# Altium PCB adau1979-fpga.PcbDoc (part 10 of 10)
Units mil, origin at the board's own origin, x right, y up, seen from the top; angles counter-clockwise.
Board outline 7874.02 x 9055.12 mil, 4 copper layers (Top Layer, GND, POWER, Bottom Layer), stack 23.756 mil thick; 636 components, 457 nets, 2015 pads, 4184 vias.
Unrouted connection lines stored in the file: 10.
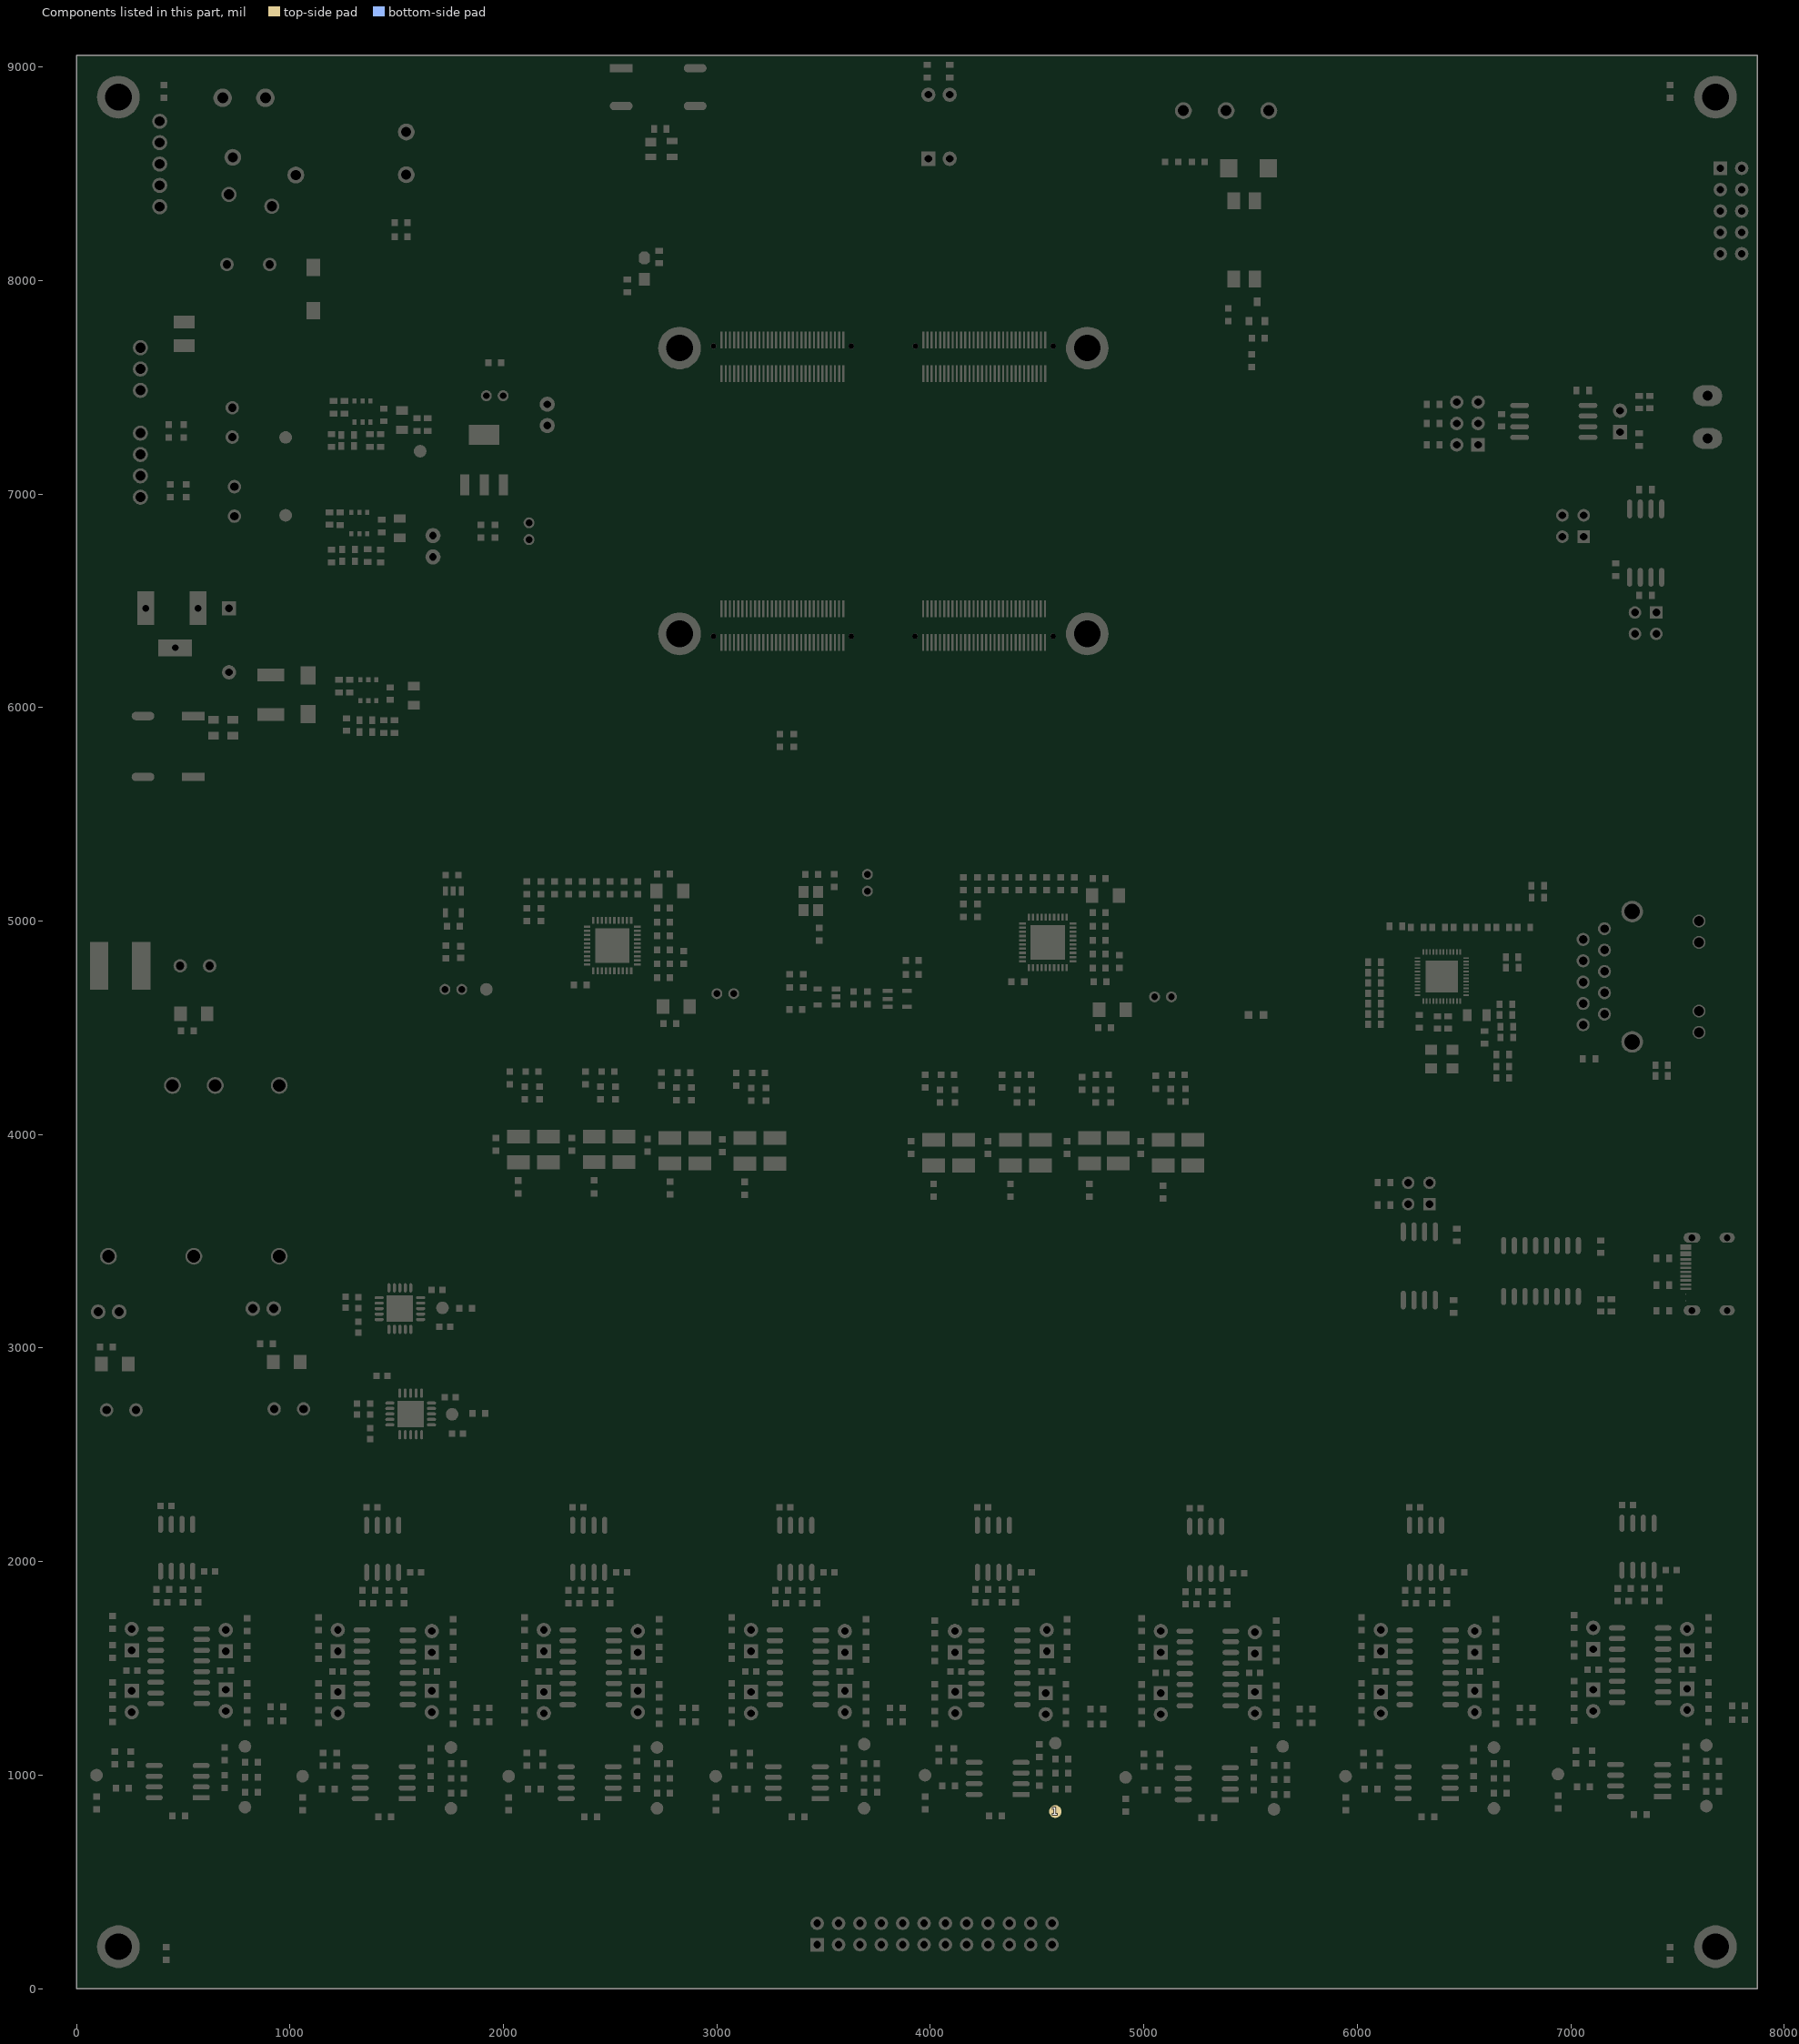
[diagram p9: the components of this part, seen from the top]

## Other copper (continued)
Bottom Layer:
  pour cut-out: 7263.67,2015.94 7263.76,2015.84 7320.34,2015.84 7320.34,1899.3 7327.23,1892.42 7327.23,1772.76 7271.84,1772.76 7263.67,1780.94
  pour cut-out: 6267.48,2005.93 6267.57,2005.84 6324.15,2005.84 6324.15,1889.3 6331.04,1882.41 6331.04,1762.76 6275.65,1762.76 6267.48,1770.93
  pour cut-out: 5237.48,2000.93 5237.57,2000.84 5294.15,2000.84 5294.15,1884.3 5301.04,1877.41 5301.04,1757.76 5245.65,1757.76 5237.48,1765.93
  pour cut-out: 4243.07,2005.93 4243.17,2005.84 4299.75,2005.84 4299.75,1889.3 4306.63,1882.41 4306.63,1762.76 4251.25,1762.76 4243.07,1770.93
  pour cut-out: 3317.48,2005.93 3317.57,2005.84 3374.15,2005.84 3374.15,1889.3 3381.04,1882.41 3381.04,1762.76 3325.65,1762.76 3317.48,1770.93
  pour cut-out: 2338.07,1995.93 2338.17,1995.84 2394.75,1995.84 2394.75,1879.3 2401.63,1872.41 2401.63,1752.76 2346.25,1752.76 2338.07,1760.93
  pour cut-out: 1373.07,2010.93 1373.17,2010.84 1429.75,2010.84 1429.75,1894.3 1436.63,1887.41 1436.63,1767.76 1381.25,1767.76 1373.07,1775.93
  pour cut-out: 408.07,2005.93 408.17,2005.84 464.75,2005.84 464.75,1889.3 471.63,1882.41 471.63,1762.76 416.25,1762.76 408.07,1770.93
  pour cut-out: 7379.41,975 7379.41,925 7384.41,920 7479.41,920 7499.41,900 7659.41,900 7674.41,915 7674.41,975
  pour cut-out: 6384.41,965 6384.41,915 6389.41,910 6484.41,910 6504.41,890 6664.41,890 6679.41,905 6679.41,965
  pour cut-out: 5354.41,960 5354.41,910 5359.41,905 5454.41,905 5474.41,885 5634.41,885 5649.41,900 5649.41,960
  pour cut-out: 4375,985 4375,935 4380,930 4475,930 4495,910 4655,910 4655,985
  pour cut-out: 3434.41,965 3434.41,915 3439.41,910 3534.41,910 3554.41,890 3714.41,890 3729.41,905 3729.41,965
  pour cut-out: 2464.41,965 2464.41,915 2469.41,910 2564.41,910 2584.41,890 2744.41,890 2759.41,905 2759.41,965
  pour cut-out: 1499.41,965 1499.41,915 1504.41,910 1599.41,910 1619.41,890 1779.41,890 1794.41,905 1794.41,965
  pour cut-out: 534.41,970 534.41,920 539.41,915 634.41,915 654.41,895 814.41,895 829.41,910 829.41,970
GND (plane layer: these items are gaps in the copper):
  pour cut-out: 7262.48,2015.93 7262.57,2015.84 7319.15,2015.84 7319.15,1899.3 7326.04,1892.41 7326.04,1772.76 7270.65,1772.76 7262.48,1780.93
  pour cut-out: 6267.48,2005.93 6267.57,2005.84 6324.15,2005.84 6324.15,1889.3 6331.04,1882.41 6331.04,1762.76 6275.65,1762.76 6267.48,1770.93
  pour cut-out: 5237.48,2000.93 5237.57,2000.84 5294.15,2000.84 5294.15,1884.3 5301.04,1877.41 5301.04,1757.76 5245.65,1757.76 5237.48,1765.93
  pour cut-out: 4243.92,2003.37 4244.01,2003.27 4300.59,2003.27 4300.59,1886.73 4307.48,1879.85 4307.48,1760.19 4252.09,1760.19 4243.92,1768.37
  pour cut-out: 3318.92,2008.37 3319.01,2008.27 3375.59,2008.27 3375.59,1891.73 3382.48,1884.85 3382.48,1765.19 3327.09,1765.19 3318.92,1773.37
  pour cut-out: 2338.07,1995.93 2338.17,1995.84 2394.75,1995.84 2394.75,1879.3 2401.63,1872.41 2401.63,1752.76 2346.25,1752.76 2338.07,1760.93
  pour cut-out: 1373.33,2003.37 1373.42,2003.27 1430,2003.27 1430,1886.73 1436.89,1879.84 1436.89,1760.19 1381.5,1760.19 1373.33,1768.37
  pour cut-out: 408.07,2005.93 408.17,2005.84 464.75,2005.84 464.75,1889.3 471.63,1882.41 471.63,1762.76 416.25,1762.76 408.07,1770.93
  pour cut-out: 4375,985 4375,935 4380,930 4475,930 4495,910 4615,910 4615,985
  pour cut-out: 7379.41,975 7379.41,925 7384.41,920 7479.41,920 7499.41,900 7659.41,900 7674.41,915 7674.41,975
  pour cut-out: 6384.41,965 6384.41,915 6389.41,910 6484.41,910 6504.41,890 6664.41,890 6679.41,905 6679.41,965
  pour cut-out: 5354.41,960 5354.41,910 5359.41,905 5454.41,905 5474.41,885 5634.41,885 5649.41,900 5649.41,960
  pour cut-out: 3434.41,965 3434.41,915 3439.41,910 3534.41,910 3554.41,890 3714.41,890 3729.41,905 3729.41,965
  pour cut-out: 2464.41,965 2464.41,915 2469.41,910 2564.41,910 2584.41,890 2744.41,890 2759.41,905 2759.41,965
  pour cut-out: 1499.41,965 1499.41,915 1504.41,910 1599.41,910 1619.41,890 1779.41,890 1794.41,905 1794.41,965
  pour cut-out: 534.41,970 534.41,920 539.41,915 634.41,915 654.41,895 814.41,895 829.41,910 829.41,970
  lines w10: 0,4975 0,9055.12 7874.02,9055.12 7874.02,2900 5530,2900 5530,4975 5450,4975 0,4975
POWER (plane layer: these items are gaps in the copper):
  pour cut-out: 1373.07,2010.93 1373.17,2010.84 1429.75,2010.84 1429.75,1894.3 1436.63,1887.41 1436.63,1767.76 1381.25,1767.76 1373.07,1775.93
  pour cut-out: 7263.67,2015.94 7263.76,2015.84 7320.34,2015.84 7320.34,1899.3 7327.23,1892.42 7327.23,1772.76 7271.84,1772.76 7263.67,1780.94
  pour cut-out: 6268.66,2005.94 6268.76,2005.84 6325.34,2005.84 6325.34,1889.3 6332.23,1882.42 6332.23,1762.76 6276.84,1762.76 6268.66,1770.94
  pour cut-out: 5238.66,2000.94 5238.76,2000.84 5295.34,2000.84 5295.34,1884.3 5302.23,1877.42 5302.23,1757.76 5246.84,1757.76 5238.66,1765.94
  pour cut-out: 4243.66,2010.94 4243.76,2010.84 4300.34,2010.84 4300.34,1894.3 4307.23,1887.42 4307.23,1767.76 4251.84,1767.76 4243.66,1775.94
  pour cut-out: 3318.66,2005.94 3318.76,2005.84 3375.34,2005.84 3375.34,1889.3 3382.23,1882.42 3382.23,1762.76 3326.84,1762.76 3318.66,1770.94
  pour cut-out: 2338.07,1995.93 2338.17,1995.84 2394.75,1995.84 2394.75,1879.3 2401.63,1872.41 2401.63,1752.76 2346.25,1752.76 2338.07,1760.93
  pour cut-out: 408.07,2005.93 408.17,2005.84 464.75,2005.84 464.75,1889.3 471.63,1882.41 471.63,1762.76 416.25,1762.76 408.07,1770.93
  pour cut-out: 7381.87,972.54 7381.87,922.54 7386.87,917.54 7481.87,917.54 7501.87,897.54 7661.87,897.54 7676.87,912.54 7676.87,972.54
  pour cut-out: 6386.87,962.54 6386.87,912.54 6391.87,907.54 6486.87,907.54 6506.87,887.54 6666.87,887.54 6681.87,902.54 6681.87,962.54
  pour cut-out: 5356.87,957.54 5356.87,907.54 5361.87,902.54 5456.87,902.54 5476.87,882.54 5636.87,882.54 5651.87,897.54 5651.87,957.54
  pour cut-out: 3434.41,965 3434.41,915 3439.41,910 3534.41,910 3554.41,890 3714.41,890 3729.41,905 3729.41,965
  pour cut-out: 2465.64,963.77 2465.64,913.77 2470.64,908.77 2565.64,908.77 2585.64,888.77 2745.64,888.77 2760.64,903.77 2760.64,963.77
  pour cut-out: 1499.41,965 1499.41,915 1504.41,910 1599.41,910 1619.41,890 1779.41,890 1794.41,905 1794.41,965
  pour cut-out: 534.41,970 534.41,920 539.41,915 634.41,915 654.41,895 814.41,895 829.41,910 829.41,970
  pour cut-out: 4375,985 4375,935 4380,930 4475,930 4495,910 4615,910 4615,985
  lines w20: -5,5440 1175,5440 1215,5480 ; -5,7520 390,7520 410,7540 1250,7540 1345,7445 1345,6570 ; 0,2970 265,2970 695,3400 1730,3400 1815,3315 1815,3115 1800,3100 1580,3100 1585,3105 1585,3259.17 1584.17,3260 1430,3260 1395,3295 765,3295 310,2840 310,2650 75,2415 75,1155 295,935 7270,935 7300,905 7300,720 7240,660 4690,660 4455,425 4385,425 4315,355 4315,185 4315,-5 ; 210,1190 455,1190 595,1330 595,1847.76 647.24,1900 705,1900 760,1845 760,1235 765,1230 895,1230 930,1265 930,1885 950,1905 980,1905 1020,1865 1020,1255 1050,1225 1535.57,1225 1585,1274.43 1585,1875 1605,1895 1655,1895 1675,1875 1675,1265 1725,1215 1830,1215 1870.1,1255.1 1870.1,1865.1 1905,1900 1940,1900 1970,1870 1970,1250 2010,1210 2500,1210 2555,1265 2555,1865 2580,1890 2620,1890 2655,1855 2655,1267.86 2717.86,1205 2795,1205 2860,1270 2860,1855 2885,1880 2930,1880 2955,1855 2955,1240 2995,1200 3460,1200 3510,1250 3510,1855 3545,1890 3610,1890 3640,1860 3640,1250 3670,1220 3780,1220 3815,1255 3815,1825 3855,1865 3890,1865 3915,1840 3915,1255 3950,1220 4375,1220 4430,1275 4430,1890 4445,1905 4490,1905 4510,1885 4510,1260 4550,1220 4615,1220 4670,1275 4670,1850 4720,1900 4785,1900 4835,1850 4835,1255 4875,1215 5355,1215 5405,1265 5405,1860 5440,1895 5490,1895 5515,1870 5515,1255 5555,1215 5619.25,1215 5675,1270.75 5675,1840 5715,1880 5800,1880 5840,1840 5840,1270 5910,1200 6355,1200 6450,1295 ; 465,2990 1765,2990 1890,2865 1890,2580 1840,2530 1447.5,2530 ; 1345,6565 2180,6565 4675,6565 ; 1350,6990 6470,6990 6835,7355 7230,7355 7430,7155 7430,6910 7170,6650 6707.52,6187.52 4787.52,6187.52 4680,6080 1440,6080 1350,5990 1350,5755 2075,5030 3140,5030 3285,4885 ; 1355,5895 5410,5895 5885,5420 6210,5095 6210,5035 6145,4970 6000,4970 5950,4920 5950,4815 5985,4780 6105.5,4780 6145.5,4820 6565,4820 6615,4870 6765,4870 6845,4950 6845,5220 5882.5,6182.5 ; 1690,4965 1810,4845 2525,4845 2595,4915 2935,4915 3120,4730 4330,4730 4565,4965 4910,4965 4945,4930 4945,4635 4910.5,4600.5 4830.6,4600.5 4796.1,4635 2205,4635 2050,4480 1615,4480 1590,4505 1590,4880 1685,4975 1685,5010 1215,5480 ; 2040,4480 2040,4425 1835,4220 1835,3865 1900,3800 4810,3800 5530,3080 7380,3080 7765,2695 7765,1245 7715,1195 7660,1195 7590,1265 7590,1875 7560,1905 7483.48,1905 7450,1871.52 7450,1275 7385,1210 6935,1210 6885,1260 6885,1855 6850,1890 6775,1890 6745,1860 6745,1280 6685,1220 6585,1220 6545,1260 6545,1870 6520,1895 6480,1895 6447.51,1862.51 6447.51,1295 ; 3290,4885 4005,4885 4090,4800 4090,4740 ; 3960,4625 3960,4125 4035,4050 4870,4050 5735,3185 7695,3185 7885,2995 7885,2975 ; 4685,6555 4685,6330 4560,6205 1365,6205 1215,6055 1215,5845 1215,5480 ; 4950,4925 5085,4790 ; 7755,2025 7370,2025 7345,2000 7345,1305 7325,1285 7125,1285 7085,1325 7085,1975 7030,2030 6410,2030 6350,1970 6350,1307.1 6322.9,1280 6041.96,1280 6010,1311.96 6010,1975 5960,2025 5380,2025 5315,1960 5315,1297.1 5302.9,1285 5060,1285 4989.41,1355.59 4989.41,1920.59 4915,1995 4385,1995 4340,1950 4340,1310.1 4309.9,1280 4045,1280 4022.48,1302.52 4022.48,1922.52 3940,2005 3435,2005 3400,1970 3400,1310.1 3364.9,1275 3075,1275 3040,1310 3040,1900 2935,2005 2455,2005 2430,1980 2430,1305 2415,1290 2095,1290 2040,1345 2040,1955 1995,2000 1520,2000 1480,1960 1480,1370 1430,1320 1155,1320 1120,1355 1120,1870 985,2005 580,2005 505,1930 505,1360 420,1275 340,1275 244.41,1370.59 244.41,2284.41 455,2495 1080,2495 1115,2530 1445,2530 1450,2525 1450,2820 1130,2820 900,2590 410,2590 130,2310 130,1260 300,1090 7870,1090

## Silkscreen, mask and mechanical layers (free items; w line width, h text height)
Top Overlay:
  circle w0.5: c4575.15,6335.16 r11.81
  circle w0.5: c4575.15,7693.42 r11.81
  circle w0.5: c4734.76,7683.58 r122.05
  circle w0.5: c4734.76,6345 r122.05
  circle w0.5: c3929.48,7693.42 r11.81
  circle w0.5: c3630.27,7693.42 r11.81
  circle w0.5: c3630.27,6335.16 r11.81
  circle w0.5: c3929.48,6335.16 r11.81
  circle w0.5: c2984.61,6335.16 r11.81
  circle w0.5: c2984.61,7693.42 r11.81
  circle w0.5: c2825,6345 r122.05
  circle w0.5: c2825,7683.58 r122.05
  lines w0.5: 4001.34,6266.26 4011.18,6266.26 4011.18,6345 4001.34,6345 ; 4109.6,6266.26 4099.76,6266.26 4099.76,6345 4109.6,6345 ; 4021.02,6266.26 4021.02,6345 4030.86,6345 4030.86,6266.26 4021.02,6266.26 ; 4021.02,6423.74 4021.02,6502.48 4030.86,6502.48 4030.86,6423.74 4021.02,6423.74 ; 4040.71,6266.26 4040.71,6345 4050.55,6345 4050.55,6266.26 4040.71,6266.26 ; 4040.71,6423.74 4040.71,6502.48 4050.55,6502.48 4050.55,6423.74 4040.71,6423.74 ; 4060.39,6266.26 4070.23,6266.26 4070.23,6345 4060.39,6345 4060.39,6266.26 ; 4060.39,6423.74 4060.39,6502.48 4070.23,6502.48 4070.23,6423.74 4060.39,6423.74 ; 4080.08,6266.26 4089.92,6266.26 4089.92,6345 4080.08,6345 4080.08,6266.26 ; 4080.08,6423.74 4080.08,6502.48 4089.92,6502.48 4089.92,6423.74 4080.08,6423.74
  lines w5.91: 2962.95,7627.48 2984.61,7627.48 2984.61,7660.94 2962.95,7660.94 ; 3012.16,6305.63 2959.01,6305.63 2959.01,6463.11 3012.16,6463.11 ; 3012.16,7565.47 2959.01,7565.47 2959.01,7722.95 3012.16,7722.95 ; 3602.72,7565.47 3655.86,7565.47 3655.86,7722.95 3602.72,7722.95 ; 3651.93,7626.49 3630.27,7626.49 3630.27,7659.96 3651.93,7659.96 ; 3907.83,7627.48 3929.48,7627.48 3929.48,7660.94 3907.83,7660.94 ; 3957.04,6305.63 3903.9,6305.63 3903.9,6463.11 3957.04,6463.11 ; 3957.04,7565.47 3903.9,7565.47 3903.9,7722.95 3957.04,7722.95 ; 4547.6,6305.63 4600.74,6305.63 4600.74,6463.11 4547.6,6463.11
  lines w8: 2677.52,6266.26 ccw(c2756.26,6266.26) 2756.26,6187.52 4803.5,6187.52 ccw(c4803.5,6266.26) 4882.24,6266.26 4882.24,7762.32 ccw(c4803.5,7762.32) 4803.5,7841.06 2756.26,7841.06 ccw(c2756.26,7762.32) 2677.52,7762.32 2677.52,6266.26
  lines w10: 3111.26,7025.63 3245.26,7025.63 3245.26,7024.63 3245.26,6994.63 3316.76,7066.13 3249.26,7133.63 3249.26,7101.63 3111.26,7101.63 3111.26,7025.63 ; 4106.26,6995.63 4106.26,7071.63 4244.26,7071.63 4244.26,7103.63 4311.76,7036.13 4240.26,6964.63 4240.26,6994.63 4240.26,6995.63 4106.26,6995.63
  text "-" at 1035,8870 h30
  text "+" at 525,8865 h30
  text "1" at 3649.49,7774 h30 r180
  text "59" at 3019.32,7769 h30 r180
  text "SS15" at 2869.16,7696.08 h30 r180
  text "SS16" at 4778.92,7696.08 h30 r180
  text "60" at 3019.32,7544 h30 r180
  text "2" at 3652.83,7539 h30 r180
  text "60" at 3019.32,6514 h30 r180
  text "60" at 3964.32,6514 h30 r180
  text "SS18" at 2877.48,6360 h30 r180
  text "SS17" at 4778.92,6357.5 h30 r180
  text "59" at 3964.32,6284 h30 r180
  text "+" at 3135,270 h30
  text "-" at 3130,150 h30
Mechanical 1:
  lines w10: 5530,2900 7875,2900 ; 0,0 0,9055.12 7874.02,9055.12 7874.02,0 0,0

## Text inside footprints (layer, text, board x,y; h text height)
C60: Top Overlay "-" at 912,3221.68 h30; Top Overlay "+" at 792,3223.56 h30
C65: Top Overlay "+" at 67.79,3208.56 h30; Top Overlay "-" at 187.79,3206.68 h30
J1: Top Overlay "2" at 3652.44,7537.74 h30 r180; Top Overlay "60" at 3018.93,7542.74 h30 r180; Top Overlay "1" at 3642.63,7765 h30 r180; Top Overlay "59" at 3018.93,7767.74 h30 r180
J2: Top Overlay "1" at 3648.71,6277.74 h30 r180; Top Overlay "2" at 3652.04,6512.74 h30 r180; Top Overlay "60" at 3018.54,6512.74 h30 r180; Top Overlay "59" at 3018.54,6282.74 h30 r180
J3: Top Overlay "2" at 4597.32,7537.74 h30 r180; Top Overlay "60" at 3963.81,7542.74 h30 r180; Top Overlay "1" at 4587.51,7765 h30 r180; Top Overlay "59" at 3963.81,7767.74 h30 r180
J4: Top Overlay "59" at 3963.42,6282.74 h30 r180; Top Overlay "60" at 3963.42,6512.74 h30 r180; Top Overlay "2" at 4596.92,6512.74 h30 r180; Top Overlay "1" at 4593.59,6277.74 h30 r180
J5: Top Overlay "2" at 7815,8609 h30 r90; Top Overlay "1" at 7709.53,8610 h30 r90; Top Overlay "9" at 7709.53,8029 h30 r90; Top Overlay "10" at 7815,8012.51 h30 r90
J10: Top Overlay "2" at 3212,277 h30; Top Overlay "1" at 3216.67,176 h30; Top Overlay "24" at 4813.01,291 h30; Top Overlay "23" at 4825.01,180 h30
JP1: Top Overlay "6" at 6485,7490 h30 r90; Top Overlay "5" at 6585,7490 h30 r90; Top Overlay "2" at 6485,7130 h30 r90; Top Overlay "1" at 6585,7140 h30 r90
SW1: Top Overlay "ON" at 771.66,6255 h30 r180
SW3: Top Overlay "ON" at 3983.34,8780 h30